# EAGLE board 2026-10-24_14-12-37 (EAGLE 6.4)
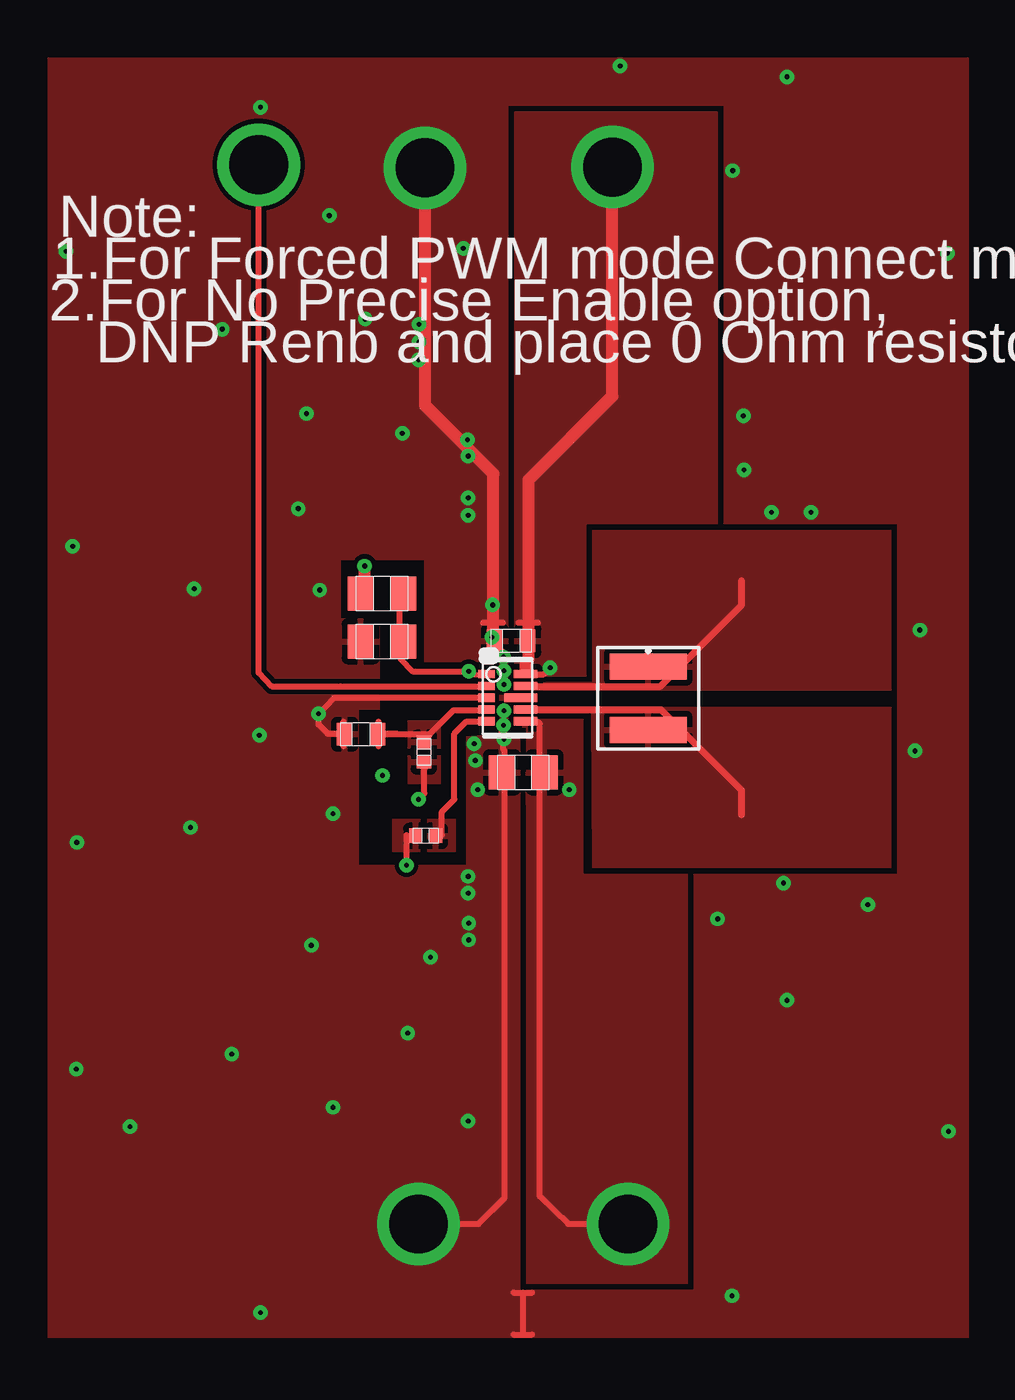
[diagram p0: board, top side]
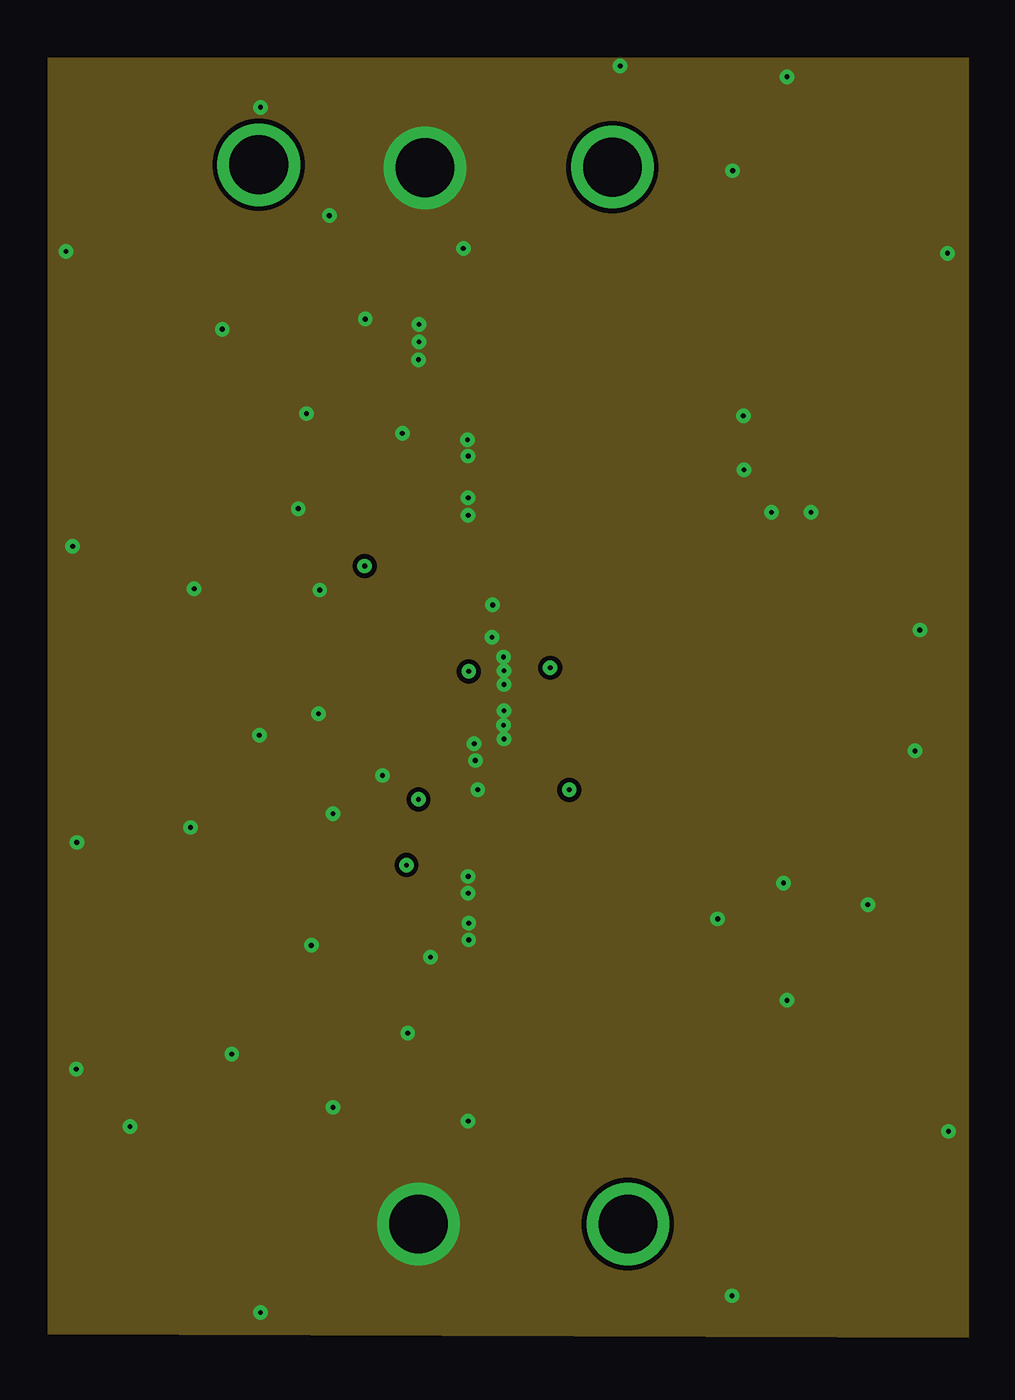
[diagram p1: board, inner layer INTERNAL1]
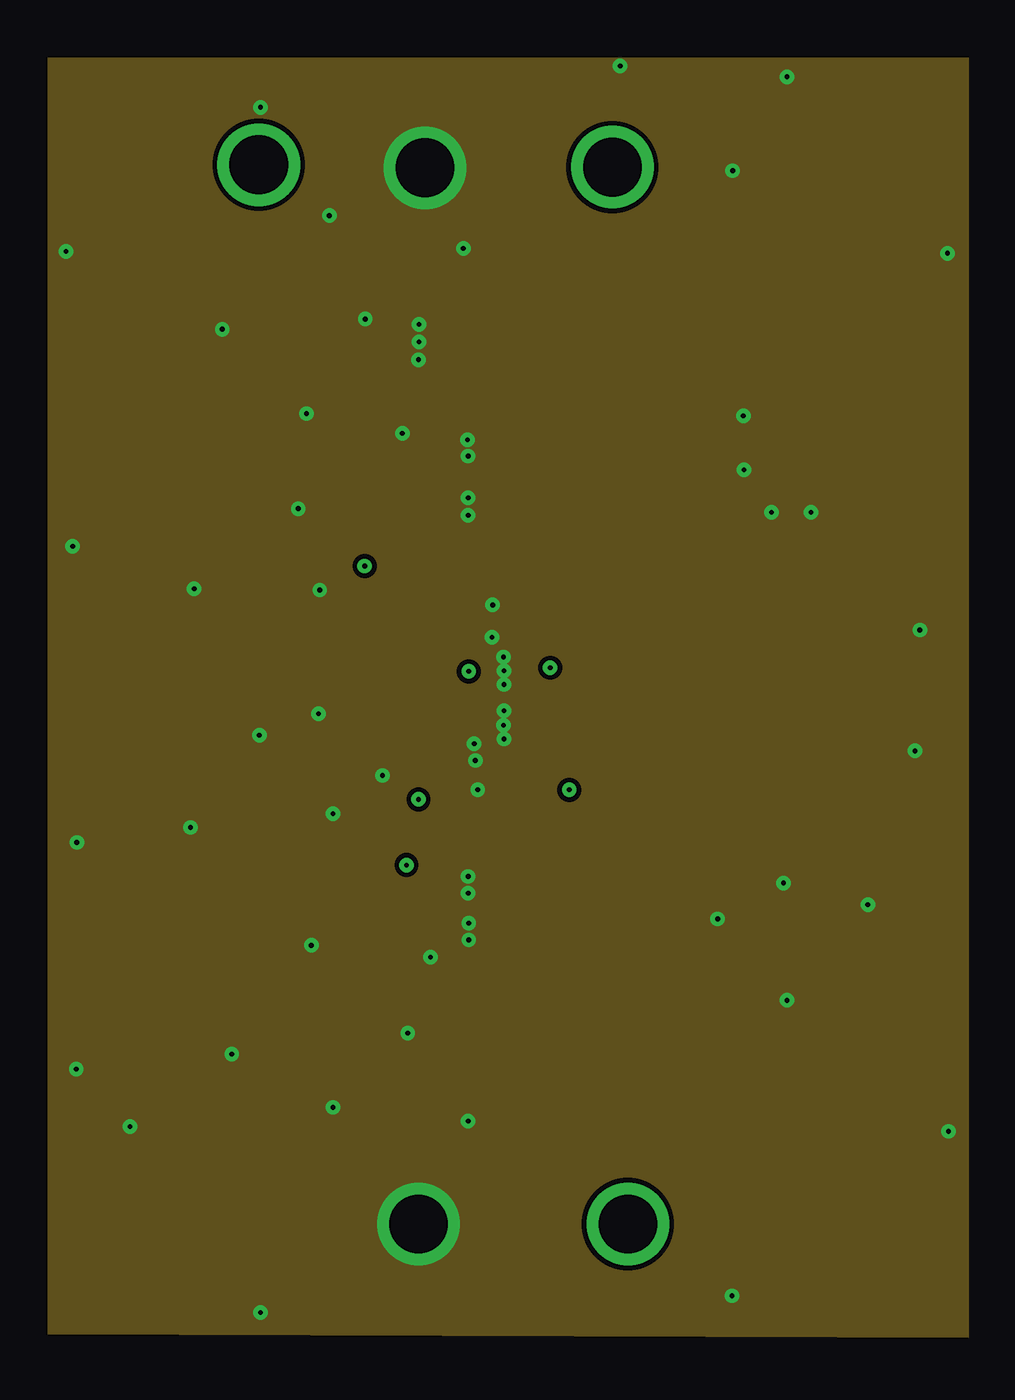
[diagram p2: board, inner layer INTERNAL2]
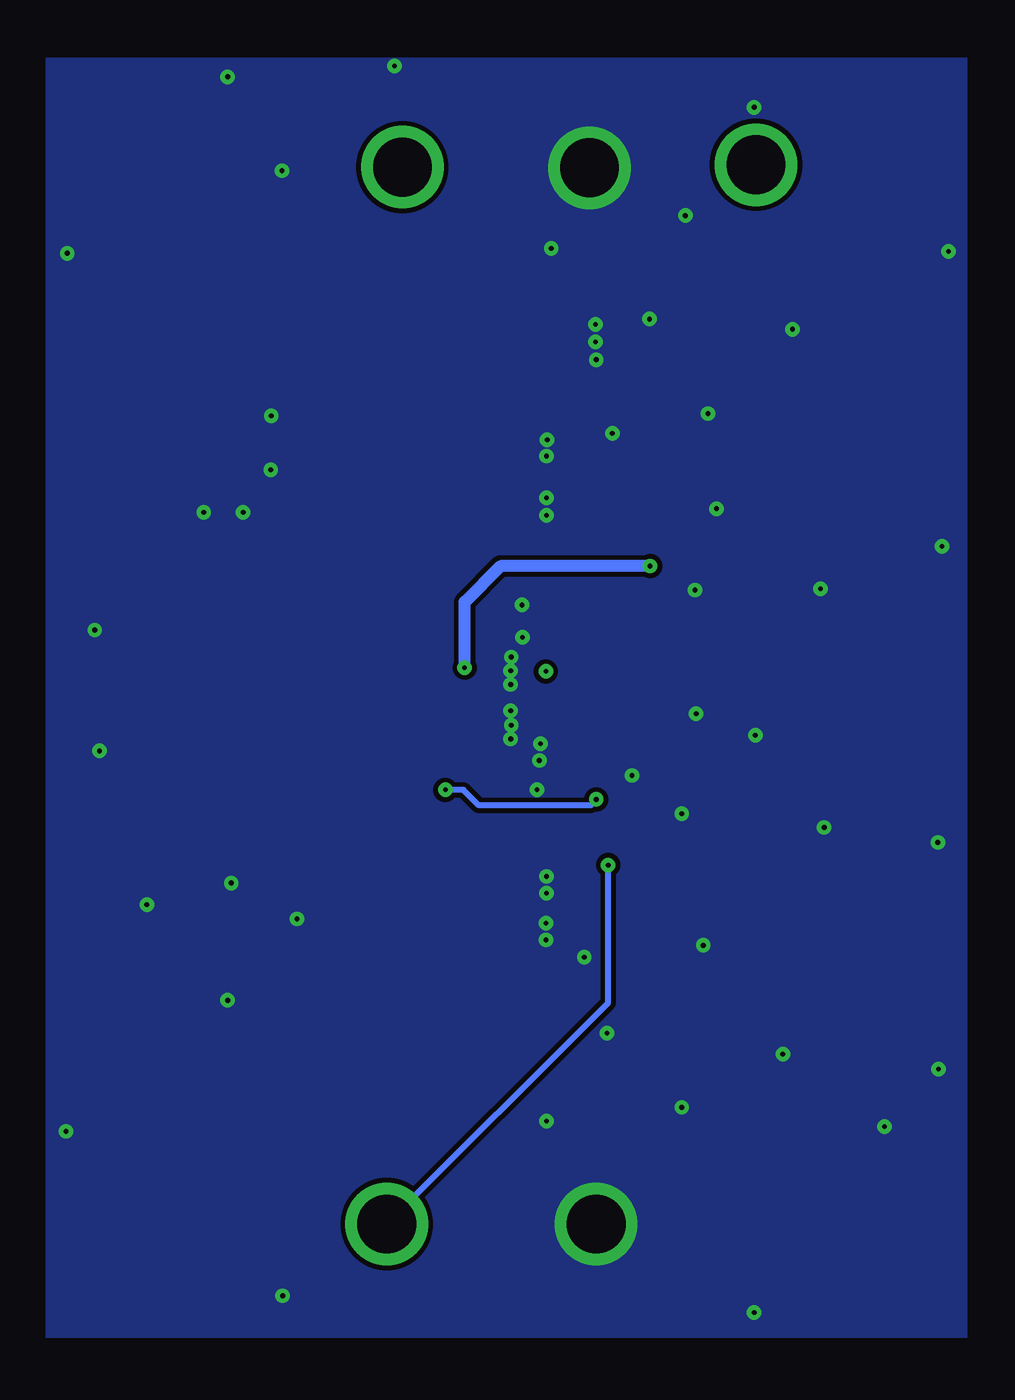
[diagram p3: board, bottom side, seen from below]

No outline drawn. Coordinates in mm, seen from the top.
Copper layers ((1*2)+(15*16)): TOP / INTERNAL1 / layer 15 / BOTTOM

## Footprints (pad centres in the part's own frame; a part is rotated, then mirrored left to right if it is on the bottom)
0603 = smd 0.66 x 0.965: 1 -0.699,0; 2 0.699,0
0805 = smd 1.118 x 1.448: 1 -0.902,0; 2 0.902,0
TP-1502 = drill 0.813 pad 1.651 round: 1 0,0
XFL4015 = smd 1.118 x 3.251: 1 -1.346,0; 2 1.346,0
0402 = smd 0.559 x 0.61: 1 -0.419,0; 2 0.419,0
DLA0010A = smd 0.7 x 0.35: 1 -0.9,1; 2 -0.9,0.5; 3 -0.9,0; 4 -0.9,-0.5; 5 -0.9,-1 | smd 1 x 0.35: 6 0.75,-1; 7 0.75,-0.5; 9 0.75,0.5; 10 0.75,1 | smd 1.4 x 0.35: 8 0.55,0

## Placement (x,y rotation side)
Cin  [0603]  45.85,55.75 180 top
Cout  [0805]  46.35,50.16 180 top
GND  [TP-1502]  42.19,75.82 270 top
GND1  [TP-1502]  41.88,30.99 270 top
L1  [XFL4015]  51.66,53.31 270 top
MODE  [TP-1502]  35.1,75.95 270 top
Renb  [0805]  40.36,55.73 180 top
Rent  [0805]  40.36,57.76 0 top
Rfbb  [0603]  39.47,51.79 180 top
Rfbt  [0402]  42.14,51.03 90 top
Rpg  [0402]  42.21,47.47 0 top
U1  [DLA0010A]  45.69,53.34 0 top
VIN  [TP-1502]  50.14,75.84 270 top
VOUT  [TP-1502]  50.8,30.99 270 top

## Library data of the parts
Cin = ultra-librarian; RefDes: Cin; Type: GRM188R60J226MEA0D
Cout = ultra-librarian; RefDes: Cout; Type: MSASL219LB5226MTNA01
GND = ultra-librarian; RefDes: GND; Type: TP-1502
GND1 = ultra-librarian; RefDes: GND1; Type: TP-1502
L1 = ultra-librarian; RefDes: L1; Type: XFL4015-471MEB
MODE = ultra-librarian; RefDes: MODE; Type: TP-1502
Renb = ultra-librarian; RefDes: Renb; Type: ERJ-6ENF1003V
Rent = ultra-librarian; RefDes: Rent; Type: ERJ-6ENF1003V
Rfbb = ultra-librarian; RefDes: Rfbb; Type: RC0603FR-0791KL
Rfbt = ultra-librarian; RefDes: Rfbt; Type: CRCW0402511KFKED
Rpg = ultra-librarian; RefDes: Rpg; Type: CRCW0402100KFKED
U1 = ultra-librarian; RefDes: U1; Type: TPS63802DLAR
VIN = ultra-librarian; RefDes: VIN; Type: TP-1502
VOUT = ultra-librarian; RefDes: VOUT; Type: TP-1502

## Nets
0: Cin.2 Cout.2 GND1.1 GND.1 Renb.2 Rfbb.2 U1.3 U1.8
2: Cin.1 Renb.1 Rent.1 Rent.2 U1.1 U1.10 VIN.1
5: Rfbb.1 Rfbt.2 U1.4
7: Cout.1 Rfbt.1 Rpg.1 U1.6 VOUT.1
9: L1.2 U1.7
10: Rpg.2 U1.5
11: MODE.1 U1.2
13: L1.1 U1.9

## Tracks (layer width: path | path; a pad name or v marks a point on that pad's centre or on a via)
0  (via drill 0.2 pad 0.48, 0.2 pad 0.61, 2.49 pad 3.48)
  TOP 0.254: 44.81,53.34 38.33,53.34 v37.67,52.65 37.67,52.2 38.05,51.82 38.73,51.82 | 45.95,26.29 46.35,26.29 | 46.35,26.29 46.74,26.29 | 46.35,28.07 46.74,28.07 | 45.95,28.07 46.35,28.07 | 46.35,26.29 46.35,28.07 | v41.91,30.99 44.45,30.99 45.57,32.11 45.57,49.51 45.57,51.08 45.52,51.13 45.52,51.61 | 45.44,51.92 45.57,51.92 | 45.44,51.71 45.44,52.17 | 45.57,51.71 45.57,52.17 | 38.72,51.28 38.72,52.32 | 44.65,56.53 45.49,56.53 | 44.63,53.33 44.96,53.33 | 45.74,53.33 46.79,53.33
  TOP 0.508: 42.19,65.73 45.09,62.84 45.09,56.54 45.09,55.52 v45.52,55.07 45.54,55.07 | 42.19,65.73 v42.19,75.84 | 42.19,65.73 42.55,65.41 | 45.52,51.61 v45.54,51.59 | 45.54,52.17
  other vias: 45.54,53.9 45.54,52.78 44.02,61.82 41.94,69.19 45.54,54.48 56.9,61.21 57.4,45.47 62.99,51.08 44.32,50.67 29.67,35.13 27.38,37.57 35.2,27.23 33.99,38.2 38.28,35.94 27.41,47.19 32.23,47.83 37.36,42.82 35.15,51.74 38.28,48.41 41.45,39.09 44.02,35.36 42.42,42.32 40.39,50.04 44.02,45.75 44.04,43.05 44.02,45.03 44.04,43.76 32.38,57.96 27.23,59.77 36.8,61.37 33.58,68.99 26.95,72.29 35.2,78.41 37.16,65.41 38.13,73.81 39.65,69.42 37.72,57.91 43.99,64.29 44.02,61.09 44.02,63.6 41.22,64.57 41.91,67.69 41.94,68.45 43.81,72.42 44.42,49.43 44.27,51.38 45.52,52.17 55.22,27.94 54.61,43.94 64.41,34.92 57.56,40.49 60.99,44.55 45.03,55.91 45.06,57.28 58.57,61.21 63.2,56.21 55.73,63.02 50.47,80.16 55.24,75.72 55.7,65.3 57.56,79.71 64.36,72.21
  pour TOP: 45.34,51.82 45.72,51.69 46.23,51.69 46.23,26.16 26.16,26.16 26.16,80.52 65.28,80.52 65.28,26.16 46.48,26.16 46.48,28.19 53.59,28.19 53.59,45.85 62.23,45.85 62.23,60.71 54.86,60.71 54.86,78.49 45.72,78.49 45.72,53.47 46.86,53.21 45.72,53.21 45.72,52.07 45.34,52.07 45.34,54.86 42.16,54.86 42.16,59.18 38.61,59.18 38.61,56.69 40.26,56.69 40.26,52.83 39.37,52.83 39.37,46.23 43.94,46.23 43.94,51.69
  pour BOTTOM (rank 6): 65.28,80.52 26.16,80.52 26.16,26.16 65.28,26.16
  pour INTERNAL2 (rank 5): 65.28,80.52 65.28,26.16 26.16,26.31 26.16,80.52
  pour INTERNAL1 (rank 6): 26.16,26.31 26.16,80.52 65.28,80.52 65.28,26.16
2  (via drill 0.2 pad 0.48, 2.49 pad 3.48)
  TOP 0.203: v44.04,54.46 44.17,54.33 44.81,54.33
  TOP 0.254: v39.62,58.93 39.62,58.9 | 41.12,57.78 | 41.12,57.78 41.12,55.75 41.15,55.73 41.15,54.99 41.66,54.46 v44.04,54.46 | v47.5,54.61 47.22,54.33 46.46,54.33 | 46.15,56.53 46.99,56.53 | 44.63,54.32 44.96,54.32 | 46.13,54.32 46.76,54.32
  TOP 0.508: 39.62,57.78 39.62,58.9 | 46.46,54.43 46.46,54.86 46.58,54.99 46.58,56.54 46.58,62.59 50.14,66.14 v50.14,75.87
  BOTTOM 0.508: v47.5,54.61 47.5,57.4 45.97,58.93 v39.62,58.93
  pour TOP (rank 5): 45.97,54.23 45.97,78.23 54.61,78.23 54.61,60.71 49.02,60.71 49.02,55.4 49.02,54.23
5
  TOP 0.254: 41,51.79 41,51.82 40.23,51.82 40.26,51.79 41,51.79 | 41,51.79 42.16,51.79 42.39,51.79 43.41,52.81 44.81,52.81 | 40.22,51.28 40.22,52.32 | 44.63,52.82 44.96,52.82
  pour TOP: 41.45,51.18 41.45,52.37 42.85,52.37 42.85,51.18
7  (via drill 0.2 pad 0.61, 2.49 pad 3.48)
  TOP 0.254: VOUT.1 48.26,30.99 47.07,32.16 47.07,49.51 47.07,52.22 46.97,52.32 46.46,52.32 | v41.91,49.02 42.16,49.28 42.16,50.29 | v41.4,46.23 41.4,47.5 | v41.4,46.23 | 46.13,52.31 46.76,52.31
  BOTTOM 0.254: v41.91,49.02 42.14,48.77 46.89,48.77 47.55,49.43 v48.31,49.43 | VOUT.1 41.4,40.39 v41.4,46.23
  other vias: 50.8,30.99
  pour TOP: 41.45,49.68 41.45,50.88 42.85,50.88 42.85,49.68
  pour TOP (rank 2): 46.46,48.79 46.46,50.19 47.65,50.19 47.65,48.79
  pour TOP (rank 3): 40.79,46.79 40.79,48.18 41.99,48.18 41.99,46.79
  pour TOP (rank 4): 53.34,45.85 48.9,45.85 48.9,52.45 46.1,52.45 46.1,52.07 46.48,52.07 46.48,28.45 48.46,28.45 53.34,28.45
9
  TOP 0.254: 46.13,52.82 46.76,52.82
  TOP 0.305: 55.63,48.36 55.63,49.4 52.2,52.83 46.46,52.83
  pour TOP (rank 4): 61.98,46.1 49.28,46.1 49.25,52.7 46.02,52.93 47.93,52.93 61.98,52.93
10
  TOP 0.254: 42.9,47.5 42.9,48.49 43.43,49.02 43.43,51.82 43.94,52.32 44.81,52.32 | 44.63,52.31 44.96,52.31
  pour TOP (rank 2): 42.29,46.79 42.29,48.18 43.48,48.18 43.48,46.79
11  (via drill 2.49 pad 3.48)
  TOP 0.254: v35.13,75.97 35.13,57.33 35.13,54.41 35.69,53.82 38.61,53.82 44.81,53.82 | 44.63,53.81 44.96,53.81
13
  TOP 0.254: 46.13,53.81 46.76,53.81
  TOP 0.305: 46.46,53.82 52.17,53.82 55.63,57.28 55.63,58.29
  pour TOP (rank 3): 47.37,54 49.28,54 49.28,60.45 61.98,60.45 61.98,53.64 46.81,53.64 46.81,54

## Text on the board
ASSYNOTES: Note: | 1.For Forced PWM mode Connect mode TP to Vin TP. | 2.For No Precise Enable option, | DNP Renb and place 0 Ohm resistor for Rent